# Altium PCB PCB_DBS_Module-v1.0.PcbDoc (part 4 of 4)
Units mil, origin at the board's own origin, x right, y up, seen from the top; angles counter-clockwise.
Board outline 5571 x 4173 mil, 4 copper layers (Top Layer, PWR + Signal, GND + Signal, Bottom Layer), stack 61.653 mil thick; 149 components, 108 nets, 494 pads, 359 vias.
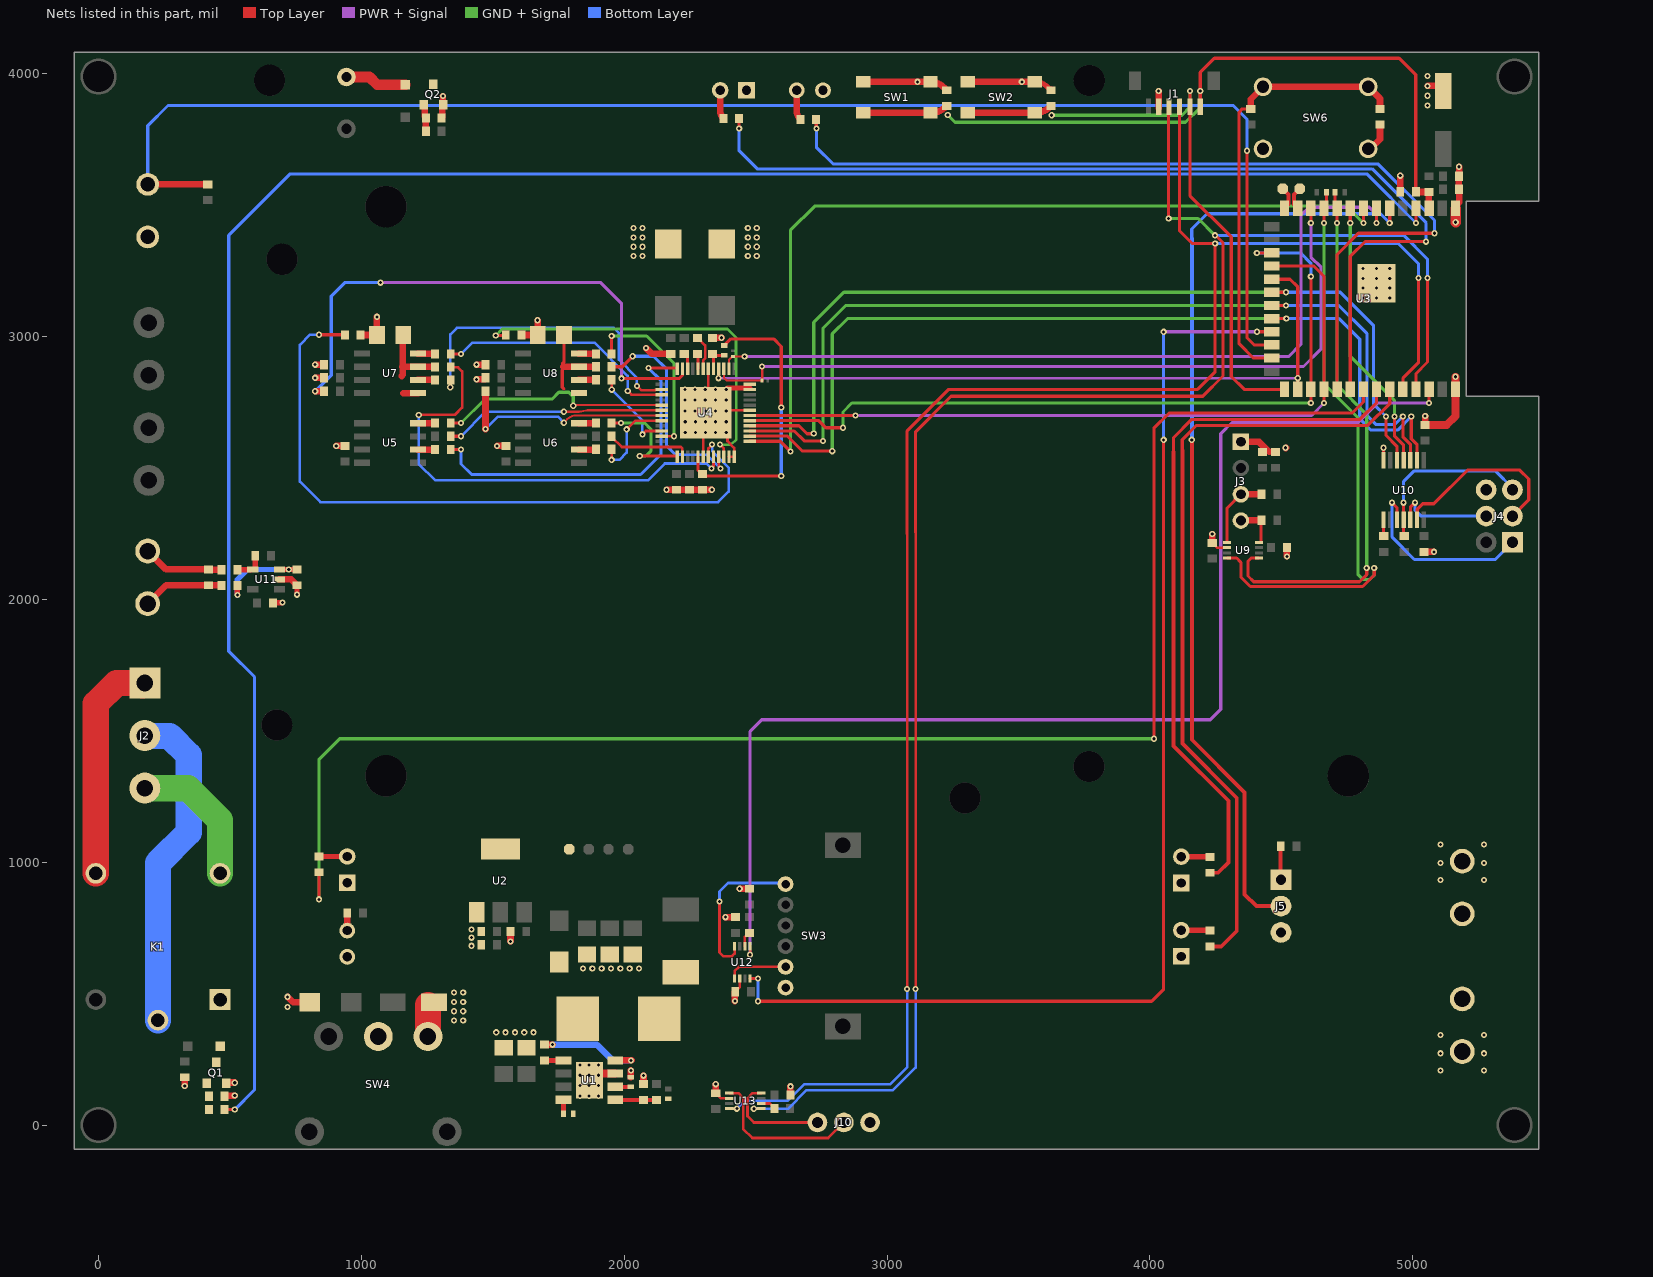
[diagram p4: the nets of this part, all layers, seen from the top]

## Via types
v1: diameter 23.62, hole 11.81, Top Layer to Bottom Layer, 359 vias

## Nets (pads, with @x,y where several pads share a name; then routed paths per layer and width w, separated by ;. In a path a pad name is that pad's centre, name@x,y a point inside that pad or via, vN(x,y) a via of type N, cw(c..) or ccw(c..) an arc to the next point about the centre after c; other vN are vias at no path point) (continued)
CA1: C26.1 U4.42 | length 841.7
  Top Layer w8: v1(1770,2714) 1828,2714 1855,2718.5 1861.13,2719.52 U4.42@2142.52,2719.52
  Top Layer w12: C26.1@1340,2620.5 v1(1379,2620.5)
  Bottom Layer w10: v1(1379,2620.5) 1472.5,2714 v1(1770,2714)
CA2: C29.1 U4.35 | length 2126.4
  Top Layer w12: v1(1989,2841) 2210.03,2841 2220.96,2851.93 2220.96,2876.7 U4.35@2221.26,2877
  Top Layer w25: v1(824,2792) C29.1@858,2792
  PWR + Signal w12: v1(1072,3205) 1911,3205 1989,3127 v1(1989,2841)
  Bottom Layer w12: v1(824,2792) 885,2853 885,3154 936,3205 v1(1072,3205)
CB1: C27.1 U4.2 | length 321.8
  Top Layer w10: C27.1@1952,2621 1952,2618.5 1990.5,2580 2215.26,2580 2221.12,2574.14 2221.12,2542.5 U4.2@2221.26,2542.35
CB2: C30.1 U4.43 | length 854
  Top Layer w8: v1@1769,2672 1782.92,2685.92 ; 1782.94,2685.94 cw(c1816.52,2652.32) 1816.52,2699.83 U4.43@2142.52,2699.83
  Top Layer w25: v1(1472,2648) C30.1@1472,2792
  Bottom Layer w10: v1(1472,2648) 1519,2695 1747,2695 v1(1770,2672)
CS_5V: J4.5 R30.1 U10.11 | length 670.7
  Top Layer w12: R30.1@4965,2242 U10.11@4965,2303.01 v1(4965,2368)
  Bottom Layer w12: v1(4965,2368) 4965,2449 5004,2488 5315,2488 5379,2424 J4.5@5379,2417
DC_VIN: D1.2 J11.1 SW4.1 | length 134.8
  Top Layer w50: D1.2@1228.98,456.54 1237.44,465 D1.2@1240.74,465
  Top Layer w100: SW4.1@1252.98,337 D1.2@1252.98,456.54
  other v1: 1352,397.5 1387,397.5 1352,433 1387,433 1352,468.5 1387,468.5 1352,504 1387,504 5105,932 5271,932 5105,997 5271,997 5105,1067 5271,1067
DRV-DIAG0: R11.2 U3.7 U4.26 | length 3126.1
  Top Layer w8: U4.26@2398.43,2877 2398.43,2911.57 2409.72,2922.86 2411.68,2922.86 R11.2@2413,2924.17 2457.83,2924.17 v1(2458,2924)
  Top Layer w12: v1(4862,3431.91) U3.7@4862,3487.98
  PWR + Signal w12: v1(2458,2924) 4528,2924 4574,2970 4574,3461 4605,3492 4834,3492 4862,3464 v1(4862,3431.91)
DRV-DIAG1: R12.2 U3.12 U4.27 | length 2950.5
  Top Layer w8: U4.27@2378.74,2877 2378.74,2843.75 2389.49,2833 R12.2@2524.17,2833
  Top Layer w10: R12.2@2524.17,2833 v1@2524.17,2886
  Top Layer w12: U3.12@4606,3493.98 U3.12@4612,3487.98 v1(4612,3431.91)
  PWR + Signal w12: v1(2524,2886) 4584,2886 4651,2953 4651,3262.98 4612,3301.98 v1(4612,3431.91)
DRV-DIR: U3.18 U3.30 U4.18 | length 2902.3
  Top Layer w12: U4.18@2477.17,2699.83 v1(2880,2699.83) ; U3.18@4462.93,3268.15 4518.85,3268.15 ; 4519,3268 4519.29,3268.29 4623.71,3268.29 4662,3230 U3.30@4662,2799 v1(4662,2747)
  PWR + Signal w12: v1(2880,2699.83) 4614.83,2699.83 v1(4662,2747)
DRV-EN: U3.19 U3.28 U4.28 | length 2742.5
  Top Layer w10: v1(2358.04,2841.6) 2358.84,2841.6 2359.06,2841.81 U4.28@2359.06,2877
  Top Layer w12: U3.19@4462.93,3218.15 4532.85,3218.15 4562,3189 U3.28@4562,2799
  PWR + Signal w10: v1(2358.04,2841.6) v1(4562,2841.6)
  Bottom Layer w10: v1(2358.04,2841.6) 2358.84,2841.6 v1@2359.06,2841.81
DRV-STEP: U3.17 U3.29 U4.17 | length 3036.2
  Top Layer w12: U4.17@2477.17,2680.15 2739.85,2680.15 2767,2653 v1(2832,2653) v1@2838,2653 ; v1@4406.72,3318.15 4462.64,3318.15 U3.17@4462.79,3318.29 U3.17@4462.93,3318.15 ; v1(4612,2747) U3.29@4612,2799 v1(4612,3228)
  GND + Signal w12: v1(2832,2653) 2832,2713 2866,2747 v1(4612,2747)
  Bottom Layer w12: v1(4406.57,3318.29) 4572.71,3318.29 4612,3279 v1(4612,3228)
ESP-EN: C15.2 C16.1 J1.6 R4.1 SW1.3 SW1.4 U3.3 | length 2941.5
  Top Layer w12: J1.6@4191.03,3869.59 J1.6@4191.03,3873.59 4191.03,3934 4191.06,4005.06 4245,4059 4948,4059 5011,3996 C15.2@5011,3555
  Top Layer w25: SW1.3@2909.05,3850.94 3110.94,3850.94 3111,3851 3111.06,3850.94 SW1.4@3164.95,3850.94 ccw(c3164.95,3937.84) 3226.4,3876.4 C16.1@3227,3877 ; C15.2@5011,3555 ccw(c5023.07,3567.07) 5023.07,3550 R4.1@5061,3550 5061,3490.39 ccw(c5064.41,3490.39) U3.3@5062,3487.98
  GND + Signal w12: v1(3230.71,3842.71) 3258.41,3815 4135,3815 4191.06,3871.06 v1(4191.06,3934)
GND: C2.1 C3.1 C5.1 C6.1 C7.1 C8.1 C9.1 C10.1 C11.1 C12.2 C13.1 C14.1 C15.1 C16.2 C17.2 C18.1 C19.2 C20.2 C22.2 C23.2 C24.2 C28.2 C31.2 C32.2 C33.2 C34.1 C35.1 C36.1 C37.2 C38.1 C39.1 C40.2 C41.2 C42.2 C43.2 C44.1 C45.2 C46.2 C47.2 C48.2 C49.2 C50.2 D2.1 D3.2 D4.1 J1.2 J3.1 J4.6 J5.3 J7.1 J9.2 J10.3 J11.2 LED1.2 LED2.1 LED3.1 LED4.1 LED5.1 LED6.2 P4.1 Q1.2 Q2.2 R2.1 R3.1 R20.1 R21.1 R22.2 R23.2 R25.1 R27.1 R32.2 SW1.1 SW1.2 SW2.1 SW2.2 SW3.1 SW6.3 SW6.4 U1.7 U1.9 U2.1 U2.4 U3.1 U3.40 U3.41 U4.6 U4.11 U4.12 U4.19 U4.23 U4.24 U4.30 U4.49 U9.2 U10.7 U11.2 U12.2 U13.2 | length 4000.5
  Top Layer w10: U4.6@2300,2542.35 2300,2620 U4.49@2309,2629 ; U4.49@2308,2793 2309.58,2793 2319.68,2803.1 U4.30@2319.68,2877 ; C49.2@2348,121 2350.5,121 2360.5,111 2360.5,109.57 2368.23,101.84 U13.2@2398.98,101.84 ; U4.49@2388,2629 2392.89,2624.11 2392.89,2602.11 2418.11,2576.89 U4.12@2418.11,2542.35 U4.11@2398.43,2542.35 ; U4.49@2388,2711 2396.52,2719.52 U4.19@2477.17,2719.52 ; U4.49@2388,2793 U4.49@2393.26,2798.26 ; C46.2@2422,792 C46.2@2423,791 ; C47.2@2423,509.5 2439.31,525.81 U12.2@2439.31,557.95 ; U4.23@2477.17,2798.26 2477.17,2804.26 U4.24@2477.17,2817.94 ; C41.2@4249.5,2202.7 4255.36,2196.84 U9.2@4292.98,2196.84
  Top Layer w12: v1(4888,2577) 4888.11,2576.89 4888.11,2529.11 U10.7@4888.23,2528.99
  Top Layer w20: C44.1@663,1986 664.31,1987.31 699.31,1987.31 v1(700,1988) ; v1(755,2018) R32.2@755,2054 ; U4.49@2393.26,2804.26 U4.23@2477.17,2804.26 ; SW2.1@3561.95,3969.06 cw(c3561.95,3899.06) 3611.45,3948.55 C17.2@3623,3937
  Top Layer w25: v1(328,149) C37.2@328,182 ; R25.1@481.87,112.37 v1(518,112.37) ; Q1.2@485.4,159.63 487.77,162 v1@518,162 ; U11.2@688.18,2076 733,2076 750,2059 750,2056.5 752.5,2054 R32.2@755,2054 ; v1(719,488) 740,467 D2.1@803.26,467 ; v1(824,2843) C32.2@858,2843 ; v1(824,2893) C33.2@858,2893 ; v1(904,2584) C23.2@938,2584 ; R22.2@997,3006 R20.1@1059,3006 v1(1059,3075) ; R27.1@1305,3831 1307.5,3833.5 1307.5,3875.76 Q2.2@1311.4,3879.66 ; v1(1310,3915) 1310,3881.06 Q2.2@1311.4,3879.66 ; Q2.2@1311.4,3881.63 Q2.2@1311.4,3879.66 ; v1(1438,2893) C31.2@1472,2893 ; v1@1438.81,2837 C28.2@1469.5,2837 ; v1(1516,2584) C24.2@1550,2584 ; U2.4@1529,1050.16 U2.4@1529.16,1050 ; v1(1567,699) C9.1@1567,737 ; R23.2@1609,3006 R21.1@1671,3006 1670,3007 v1(1670,3062) ; U1.9@1867,171 U1.9@1892,196 ; C8.1@2025,182.5 v1(2025,208) ; R2.1@2073,156 v1(2073,188) ; v1(2083,2956) 2105,2934 C22.2@2177,2934 ; v1@2165,2417 C18.1@2199,2417 C34.1@2248,2417 C35.1@2297,2417 v1(2333,2417) ; C36.1@2336,2994 2337.42,2995.42 v1(2369.92,2995.42) ; C49.2@2348,121 v1(2348,155.62) ; v1(2385,791) C46.2@2422,791 ; v1(2421,472) 2421,506 C47.2@2422,507 ; v1(2439,899) C45.2@2476,899 ; C48.2@2632,114 v1(2632,147.5) ; SW1.2@2909.05,3969.06 v1(3115.45,3969.06) SW1.1@3164.95,3969.06 cw(c3164.95,3896.65) 3216.15,3947.85 C16.2@3227,3937 ; SW2.2@3306.05,3969.06 v1(3512.45,3969.06) SW2.1@3561.95,3969.06 ; C17.2@3623,3937 C17.2@3624,3938 ; J1.2@4033.55,3869.59 J1.2@4033.55,3873.59 v1@4033.55,3934 ; C41.2@4237,2215 v1(4237,2248.5) ; J3.1@4347,2599 4415,2599 4453,2561 ; v1@4516,2575.07 v1@4518.5,2577.57 ; v1(4521,2163.5) C40.2@4521,2197 ; SW6.4@4830,3712.89 4837.57,3712.89 4875,3750.32 C50.2@4875,3804 ; C15.1@4952,3551 v1(4952,3612) ; C42.2@5043,2180 C42.2@5042,2181 v1(5080,2181) ; C43.2@5046,2664 5047,2664 v1(5047,2697.5) ; v1(5056.19,3953.5) 5096.97,3953.5 C12.2@5116,3934.47 ; U3.1@5166.5,3500.79 5176,3510.29 C13.1@5176,3560 ; C13.1@5172.5,3557.5 C13.1@5175,3560 C14.1@5175,3610 ; C14.1@5176,3610 v1(5176,3646.1)
  Top Layer w30: U1.9@1892,196 U1.7@1965.33,196 ; C43.2@5047,2664 5129,2664 5162,2697 U3.40@5162,2799 v1(5162,2847)
  Top Layer w40: v1(5163,3435) U3.1@5163,3486.98
  other v1: 1831,111 1866.5,111 1902,111 1831,150.33 1866.5,150.33 1902,150.33 518,161 1831,189.67 1866.5,189.67 1902,189.67 1831,229 1866.5,229 1902,229 1513,353 1548.5,353 1584,353 1619.5,353 1655,353 719,449 1843,596 1878.5,596 1914,596 1949.5,596 1985,596 2020.5,596 2056,596 1419,682 1419,713 1419,744 2161,2417 4516,2577 2232,2635 2270.5,2635 2309,2635 2347.5,2635 2388,2635 2232,2676 2270.5,2676 2309,2676 2347.5,2676 2388,2676 2231,2717 2269.5,2717 2308,2717 2346.5,2717 2388,2717 2231,2758 2269.5,2758 2308,2758 2346.5,2758 2388,2758 2231,2799 2269.5,2799 2308,2799 2346.5,2799 2388,2799 1438,2837.19 4810,3146.5 4862,3146.5 4912,3146.5 4810,3184 4862,3184 4912,3184 4810,3221.5 4862,3221.5 4912,3221.5 4810,3259 4862,3259 4912,3259 2035,3306.04 2069,3306.04 2470,3306.04 2504,3306.04 2035,3341.54 2069,3341.54 2470,3341.54 2504,3341.54 2035,3377.04 2069,3377.04 2470,3377.04 2504,3377.04 2035,3412.54 2069,3412.54 2470,3412.54 2504,3412.54 5056.19,3878.5 5056.19,3916 4033.1,3934 5056.19,3991
HA1: R7.1 U4.41 | length 895
  Top Layer w8: v1(1806,2736.65) cw(c1812.18,2730.47) 1812.18,2739.2 U4.41@2142.52,2739.2
  Top Layer w12: R7.1@1340,2671 v1(1379,2671)
  GND + Signal w12: v1(1379,2671) 1470,2762 1725,2762 1751,2788 1789.3,2788 1806,2771.3 v1(1806,2736.65)
  Bottom Layer w8: v1@1804.73,2735.38 v1(1806,2736.65)
HA2: R8.2 U4.36 | length 1363.2
  Top Layer w12: R8.2@1340,2570 v1(1379,2570) ; v1(2092,2880) 2201.28,2880 2201.57,2879.7 U4.36@2201.57,2877
  Bottom Layer w12: v1(1379,2570) 1379,2515 1419,2475 2062,2475 2140,2553 2140,2832 v1(2092,2880)
HB1: R9.1 U4.1 | length 438.8
  Top Layer w12: R9.1@1952,2671 v1(1987,2671) ; v1(2059,2546) 2201.28,2546 2201.57,2545.7 U4.1@2201.57,2542.35
  GND + Signal w12: v1(1987,2671) 2077.96,2671 2101,2647.96 2101,2564 2083,2546 v1(2059,2546)
  Bottom Layer w12: v1@2059,2545.22 v1(2059,2546)
HB2: R10.2 U4.44 | length 344.4
  Top Layer w10: v1(1952,2531) R10.2@1952,2571 ; v1(2009,2647) 2042.15,2680.15 U4.44@2142.52,2680.15
  Bottom Layer w10: v1(1952,2531) 1982,2531 2009,2558 v1(2009,2647)
HOME_SW: J9.1 R41.1 U3.24 | length 5623.4
  Top Layer w12: R41.1@413,3579 R41.1@415,3579 ; v1(4369,3707) 4369,2995 4395.64,2968.36 U3.24@4462.86,2968.36 ; U3.24@4462.93,2968.15 U3.24@4463.01,2968.22
  Top Layer w25: J9.1@187,3579 R41.1@413,3579
  Bottom Layer w12: J9.1@187,3579 187,3802 264,3879 4317,3879 4369,3827 v1(4369,3707)
I2C_SCL: R6.1 U3.10 U9.5 | length 2074.6
  Top Layer w12: U9.5@4415.02,2157.47 4385.47,2157.47 4373,2145 4373,2089 4395,2067 4797,2067 4824.38,2094.38 v1(4824.38,2119.6) ; R6.1@4704,3544.05 4704,3495.98 U3.10@4712,3487.98 v1(4712,3431.91)
  GND + Signal w12: v1(4712,3431.91) 4712,2815.57 4824.38,2703.18 v1(4824.38,2119.6)
I2C_SDA: R5.1 U3.11 U9.4 | length 2292.3
  Top Layer w12: U9.4@4292.98,2157.47 4329.53,2157.47 4346,2141 4346,2085 4382,2049 4809,2049 4853,2093 v1(4853,2119) ; v1(4662,3431.91) U3.11@4662,3487.98 4671,3496.98 R5.1@4671,3542.13
  GND + Signal w12: v1(4662,3431.91) 4662,2820 4792,2690 4792,2094 4810,2076 4837,2076 4853,2092 v1(4853,2119)
  Bottom Layer w12: v1(4853,2119) v1@4854.82,2120.82
IO0: C17.1 J1.5 SW2.3 SW2.4 U3.27 | length 2298.8
  Top Layer w12: v1(4151.69,3934) J1.5@4151.66,3873.59 4151.66,3536.34 4309,3379 4309,2848 4358,2799 U3.27@4512,2799
  Top Layer w25: SW2.3@3306.05,3850.94 SW2.4@3561.95,3850.94 ccw(c3561.95,3935.42) 3621.69,3875.69 C17.1@3623,3877
  GND + Signal w12: v1(3626,3842) 4122,3842 4151.69,3871.69 v1(4151.69,3934)
KILL_RELAY: R24.1 U3.4 | length 8183.4
  Top Layer w12: R24.1@479.5,59 v1(518,59) ; v1@5012,3432.06 U3.4@5012,3487.98
  Bottom Layer w12: v1(518,59) 593,134 593,1705 495,1803 495,3385 729,3619 4824.76,3619 v1(5011.85,3431.91)
LA1: R13.1 U4.39 | length 935.8
  Top Layer w10: v1(2013,2793) 2027.43,2778.57 U4.39@2142.52,2778.57
  Top Layer w12: R13.1@1340,2934 v1(1379,2934)
  Bottom Layer w10: v1(1379,2934) 1422,2977 1885.85,2977 2013,2849.85 v1(2013,2793)
LA2: R14.2 U4.38 | length 1221.1
  Top Layer w10: v1(2048,2812) 2063.87,2796.13 2117.65,2796.13 2118.47,2796.96 2141.22,2796.96 U4.38@2142.52,2798.26
  Top Layer w12: v1(1338,2807.26) 1339,2808.26 1339,2834 R14.2@1340,2835
  Bottom Layer w10: v1(1338,2807.26) 1338,3008 1363,3033 1960,3033 1979,3014 1979,2912 2048,2843 v1(2048,2812)
LB1: R15.1 U4.47 | length 671.9
  Top Layer w10: U4.47@2142.62,2621 v1@2189.17,2621
  Top Layer w12: R15.1@1952,2934 v1(1952,3002)
  GND + Signal w12: v1(1952,3002) 2085,3002 2189.17,2897.83 v1(2189.17,2620.78)
LB2: R16.2 U4.46 | length 335
  Top Layer w10: v1(1952.17,2797.84) R16.2@1952.17,2835.83 ; v1(2069,2628) 2081.78,2640.78 U4.46@2142.52,2640.78
  Bottom Layer w10: v1(1952.17,2797.84) 2069,2681.01 v1(2069,2628)
MISO_5V: J4.1 U10.10 | length 723.7
  Top Layer w12: v1(4921,2368) 4939.41,2349.59 U10.10@4939.41,2303.01
  Bottom Layer w12: v1(4921,2368) 4921,2237 5006,2152 5314,2152 J4.1@5379,2217
MODE: J5.2 U3.6 | length 3618.6
  Top Layer w12: v1@4912,3432.06 U3.6@4912,3487.98
  Top Layer w15: v1(4159,2607) 4159,1467 4360,1266 4360,878 4405,833 J5.2@4498.4,833
  Bottom Layer w12: 4159,3374 4159,3409 4217,3467 4876.76,3467 v1(4911.85,3431.91)
  Bottom Layer w15: v1(4159,2607) 4159,3374
MOSI_5V: J4.4 U10.12 | length 380.1
  Top Layer w12: U10.12@4990.59,2303.01 4990.59,2350.72 v1(5007.87,2368)
  Bottom Layer w12: v1(5007.87,2368) 5007.87,2341.13 5032,2317 J4.4@5279,2317
NetC1_1: C1.1 D3.1 L1.1 U1.8 | length 416.5
  Top Layer w25: C1.1@1697,306 v1(1727,306) ; U1.8@1965.33,246 v1(2025,246) v1@2029,246
  Bottom Layer w25: v1(1727,306) 1896,306 1956,246 v1(2025,246)
NetC1_2: C1.2 U1.1 | length 71.7
  Top Layer w20: C1.2@1697,246 U1.1@1768.67,246
NetC4_1: C4.1 R1.1 R2.2 U1.5 | length 160.2
  Top Layer w12: R1.1@2123,96 R1.1@2125.5,96
  Top Layer w15: U1.5@1965.33,96 R2.2@2073,96 R1.1@2123,96
NetC8_2: C8.2 U1.6 | length 59.9
  Top Layer w12: U1.6@1965.33,146 U1.6@1965.58,145.75 ; C8.2@2024.75,145.75 C8.2@2025,145.5
  Top Layer w15: U1.6@1965.58,145.75 C8.2@2024.75,145.75
NetC21_2: C21.2 U4.34 | length 62.5
  Top Layer w12: C21.2@2230,2935 2230,2934.5 2240.94,2923.56 U4.34@2240.94,2877
NetC25_1: C25.1 U4.31 | length 134.2
  Top Layer w10: C25.1@2278,2994 2280.5,2994 2308,2966.5 2308,2917.21 2300,2909.21 U4.31@2300,2877
NetC25_2: C25.2 U4.32 | length 57.5
  Top Layer w12: C25.2@2279,2934 2280.02,2932.98 2280.02,2877.3 U4.32@2280.31,2877
NetC35_2: C35.2 R19.1 U4.5 | length 1111.7
  Top Layer w12: U4.5@2280.32,2542.35 2280.32,2491.19 2294.5,2477 C35.2@2297,2477 2305,2469 v1(2597,2469) ; R19.1@2380,2965.5 2383.5,2965.5 2386.5,2968.5 2386.5,2972 2405.5,2991 2568,2991 2597,2962 v1(2597,2730.04)
  Bottom Layer w12: v1(2597,2469) v1(2597,2730.04)
NetC36_2: C36.2 R19.2 U4.29 | length 104.7
  Top Layer w12: U4.29@2339.37,2877 2339.07,2877.3 2339.07,2930.93 2338.75,2931.25 C36.2@2336,2934 2341.5,2928.5 R19.2@2380,2928.5
NetD5_1: D5.1 K1.1 Q1.3
NetD6_1: D6.1 LS1.2 Q2.3 | length 236.2
  Top Layer w40: LS1.2@943,3987.42 1030.58,3987.42 1059.99,3958.01 D6.1@1167,3958.01
NetJ2_1: J2.1 K1.3 | length 876.7
  Top Layer w100: K1.3@-10.44,958 -10.44,1602.56 69,1682 J2.1@176,1682 J2.1@166.94,1672.94
NetJ2_3: J2.3 K1.2 | length 538.5
  GND + Signal w100: J2.3@176,1282 340,1282 462,1160 K1.2@462,958
NetJ5_1: J5.1 R40.1 | length 128.2
  Top Layer w12: J5.1@4497.28,934.11 J5.1@4498.4,933
  Top Layer w15: J5.1@4497.28,934.11 R40.1@4497.28,1060.73
NetJ6_1: J6.1 R33.1 R34.2 | length 310.4
  Top Layer w25: J6.1@187,1984 257,2054 R34.2@418,2054 418.5,2053.5 467.5,2053.5 R33.1@468,2053
NetJ6_2: J6.2 R34.1 R35.1 | length 310.4
  Top Layer w25: J6.2@187,2184 257,2114 R34.1@418,2114 418.5,2113.5 467.5,2113.5 R35.1@468,2113
NetLED1_1: LED1.1 R38.2 | length 114.7
  Top Layer w25: LED1.1@2656,3937 2656,3859.8 ccw(c2703.8,3859.8) R38.2@2670,3826
NetLED2_2: LED2.2 R39.2 | length 110.2
  Top Layer w25: LED2.2@2365,3937 2365,3858.97 ccw(c2405.97,3858.97) R39.2@2377,3830
NetLED3_2: LED3.2 R42.2 | length 107
  Top Layer w20: R42.2@839,1022 LED3.2@946,1022
NetLED4_2: LED4.2 R43.2 | length 106.4
  Top Layer w15: LED4.2@4119,1021 LED4.2@4119.5,1020.5 ; R43.2@4224.5,1020.5 R43.2@4225,1020
  Top Layer w20: LED4.2@4119.5,1020.5 R43.2@4224.5,1020.5
NetLED5_2: LED5.2 R44.2 | length 105.1
  Top Layer w15: R44.2@4224.44,741.56 R44.2@4227,739
  Top Layer w20: LED5.2@4123,741.56 R44.2@4224.44,741.56
NetLED6_1: LED6.1 R45.2 | length 67.4
  Top Layer w25: LED6.1@946,740 946.5,740.5 946.5,806.5 R45.2@947,807
NetQ1_1: Q1.1 R24.2 R25.2
NetQ2_1: Q2.1 R26.2 R27.2 | length 104.1
  Top Layer w25: Q2.1@1236.6,3881.63 1240.24,3877.99 1240.24,3838.26 1245,3833.5 R27.2@1245,3831 R26.2@1245,3781
NetR3_2: R3.2 U1.4 | length 53.1
  Top Layer w20: R3.2@1768.5,43 1768.59,43.09 1768.59,95.91 U1.4@1768.67,96
NetR7_2: R7.2 U5.4 | length 61.7
  Top Layer w25: U5.4@1215.3,2670 R7.2@1277,2670
NetR8_1: R8.1 U5.2 | length 62.7
  Top Layer w25: U5.2@1215.3,2570 R8.1@1278,2570
NetR9_2: R9.2 U6.4 | length 61.7
  Top Layer w25: U6.4@1827.3,2670 R9.2@1889,2670
NetR10_1: R10.1 U6.2 | length 62.7
  Top Layer w25: U6.2@1827.3,2570 R10.1@1890,2570
NetR13_2: R13.2 U7.4 | length 61.7
  Top Layer w25: U7.4@1215.3,2935 R13.2@1277,2935
NetR14_1: R14.1 U7.2 | length 62.7
  Top Layer w25: U7.2@1215.3,2835 R14.1@1278,2835
NetR15_2: R15.2 U8.4 | length 61.7
  Top Layer w25: U8.4@1827.3,2935 R15.2@1889,2935
NetR16_1: R16.1 U8.2 | length 62.7
  Top Layer w25: U8.2@1827.3,2835 R16.1@1890,2835
NetR17_2: R17.2 R20.2 U7.1 U7.3 | length 335.8
  Top Layer w25: 1153,2850 1157.25,2854.25 1157.25,2885 ; 1156,2885 1157.25,2885 ; R20.2@1159,3006 1157.25,3004.25 1157.25,2885 ; 1160,2785 U7.1@1215.3,2785 ; R17.2@1278,2885 U7.3@1215.3,2885 1157.25,2885
NetR18_2: R18.2 R21.2 U8.1 U8.3 | length 332.4
  Top Layer w12: 1770,2801 1764,2807 1764,2873 1766,2875 1766,2899 1771,2904 R21.2@1771,3006
  Top Layer w25: 1768,2885 U8.3@1827.3,2885 R18.2@1890,2885
NetR31_2: R31.2 U10.8 | length 65.3
  Top Layer w12: U10.8@4888.23,2303.01 4888.61,2302.62 4888.61,2238.39 R31.2@4889,2238
NetR32_1: R32.1 R33.2 U11.3 | length 373.2
  Top Layer w20: v1(528,2017) R33.2@528,2053 ; U11.3@688.18,2113.4 688.48,2113.7 723.09,2113.7 v1(723.39,2114) R32.1@755,2114
  Bottom Layer w20: v1(528,2017) 528,2076 566,2114 v1(723.39,2114)
NetR35_2: R35.2 R36.1 U11.4 | length 109.7
  Top Layer w20: R35.2@528,2113 U11.4@576.67,2113 ; U11.4@585.82,2113.4 593.85,2113.4 595.66,2115.21 R36.1@595.66,2165.66
NetR37_1: R37.1 U12.6 | length 59.5
  Top Layer w10: U12.6@2459,680 2459,716.5 2473.5,731 R37.1@2476,731
NetR47_1: R47.1 U13.6 | length 59.4
  Top Layer w10: U13.6@2521.02,82.16 2554.34,82.16 2571,65.5 R47.1@2571,63
O2_HEATING: R42.1 U3.33 | length 5911.7
  Top Layer w12: v1(839,859) R42.1@839,962 ; v1(4015,1470) 4015,2651 4073,2709 4770,2709 4812,2751 U3.33@4812,2799
  GND + Signal w12: v1(839,859) 839,1392 917,1470 v1(4015,1470)
OUT_A: U3.38 U12.5 | length 4648.4
  Top Layer w10: v1(2478.68,648) U12.5@2478.68,680
  Top Layer w12: v1(5062,2747) U3.38@5062,2799
  PWR + Signal w12: v1(2478.68,648) 2478.68,1497.68 2523,1542 4229,1542 4269,1582 4269,2630 4312,2673 4793,2673 4867,2747 v1(5062,2747)
OUT_A_5V: SW3.6 U12.8 | length 592.5
  Top Layer w10: v1(2362,851) 2362,657 2376,643 2410,643 2419.63,652.63 U12.8@2419.63,680
  Bottom Layer w10: v1(2362,851) 2362,888 2394.81,920.81 2609.54,920.81 SW3.6@2613.5,916.85
OUT_B: U3.23 U12.4 | length 4592.8
  Top Layer w12: U12.4@2478.68,557.95 v1(2508.5,557.95) ; v1(2509,471) 4006,471 4052,517 v1(4052,2607) ; v1(4406.94,3018.36) U3.23@4462.86,3018.36
  PWR + Signal w12: v1@4049,3018 4049.18,3018.18 4406.76,3018.18 v1(4406.94,3018.36)
  Bottom Layer w12: v1@2508.5,471 v1(2508.5,557.95) ; v1(4052,2607) v1@4052,3017
  other v1: 4052,3018
OUT_B_5V: SW3.2 U12.1 | length 228.3
  Top Layer w10: U12.1@2419.63,557.95 2419.63,585.63 2435.89,601.89 SW3.2@2613.5,601.89
RLY_COM: J2.2 K1.5 | length 1241.7
  Bottom Layer w100: J2.2@176,1482 177.82,1480.18 269.82,1480.18 343,1407 ; K1.5@225.78,398.95 225.78,996.78 343,1114 343,1394
RUN_LED: R43.1 U3.34 | length 2666.4
  Top Layer w12: 4090,2560 4090,2616 4159,2685 4798,2685 4862,2749 U3.34@4862,2799
  Top Layer w15: 4090,2560 4090,1442 4298,1234 4298,999 4259,960 R43.1@4228,960
RXD0: J1.4 U3.36 U13.4 | length 6850.9
  Top Layer w10: U13.4@2398.98,62.47 v1@2428,62.53 ; v1(3076,518) 3076,1348 3076,1453 3076,2250
  Top Layer w12: 3076,2250 3076,2641 3234,2799 4181,2799 4248,2866 v1(4248,3354) 4161,3354 4112.29,3402.71 J1.4@4112.29,3873.59 ; U3.36@4962,2799 4962,2841 5021,2900 v1@5021,3222
  Bottom Layer w10: v1(2428.19,62.53) 2457.66,92 2621,92 2684,155 3011,155 3076,220 3076,431 v1(3076,518)
  Bottom Layer w12: v1(4248,3354) 4945,3354 5021,3278 v1@5021,3222
  other v1: 5021,3222.46
RXD_5V: J10.2 U13.1 | length 600.3
  Top Layer w10: U13.1@2398.98,121.53 2434.47,121.53 2452,104 2452,-14 2487.05,-49.06 2775.95,-49.06 J10.2@2835,10
SCK_5V: J4.3 U10.13 | length 706.8
  Top Layer w12: U10.13@5016.18,2303.01 5016.81,2303.64 5016.81,2342.81 5038,2364 5080,2364 5208,2492 5407,2492 5441,2458 5441,2379 J4.3@5379,2317
SCL_5V: J3.4 R29.1 U9.8 | length 158.6
  Top Layer w12: U9.8@4423,2217.43 R29.1@4423,2300
  Top Layer w25: J3.4@4346.5,2300.5 R29.1@4422.5,2300.5
SDA_5V: J3.3 R28.1 U9.1 | length 282.4
  Top Layer w12: U9.1@4292.98,2216.53 4292.98,2346.98 J3.3@4346,2400
  Top Layer w25: J3.3@4346.5,2399.5 R28.1@4423.5,2399.5
SPI_CS0: U3.8 U4.13 | length 3312.5
  Top Layer w12: U4.13@2477.17,2601.41 2593.59,2601.41 v1(2632,2563) ; v1(4812,3431.91) U3.8@4812,3487.98
  GND + Signal w12: v1(2632,2563) 2632,3404 2724,3496 4747.91,3496 v1(4812,3431.91)
SPI_CS1: U3.9 U10.4 | length 1043.1
  Top Layer w12: v1@4762,3432.06 U3.9@4762,3487.98 ; v1(4929.87,2696.13) 4930,2696 4930,2622 4965,2587 U10.4@4965,2528.99
  GND + Signal w12: v1(4761.85,3431.91) 4761.85,2925.15 4930,2757 4930,2696.26 v1(4929.87,2696.13)
SPI_MISO: U3.20 U4.16 U10.5 | length 3513.7
  Top Layer w12: U4.16@2477.17,2660.46 2664.54,2660.46 2695,2630 2720,2630 v1(2721,2631) ; U3.20@4462.79,3168.29 U3.20@4462.79,3168.29 4517.82,3168.33 v1(4517.85,3168.36) ; v1(4898,2696) 4898,2624 4939.41,2582.59 U10.5@4939.41,2528.99
  GND + Signal w12: v1(2721,2631) 2721,3054 2835.36,3168.36 v1(4517.85,3168.36)
  Bottom Layer w12: v1(4517.85,3168.36) 4723.64,3168.36 4851,3041 4851,2743 v1(4898,2696)
SPI_MOSI: U3.21 U4.15 U10.3 | length 3583.8
  Top Layer w12: U4.15@2477.17,2640.78 2646.22,2640.78 2684,2603 v1@2758,2603 ; U3.21@4462.93,3118.15 4463.01,3118.22 v1(4517.85,3118.22) v1@4518,3118.22 ; v1(4961.87,2696.13) 4962,2696 4962,2619 4990.59,2590.41 U10.3@4990.59,2528.99
  GND + Signal w12: v1(2756,2603) 2756,3032 2842.22,3118.22 v1(4517.85,3118.22)
  Bottom Layer w12: v1@4518,3118.22 4718.78,3118.22 4825,3012 4825,2700 4859,2666 4932,2666 4961.87,2695.87 v1(4961.87,2696.13)
SPI_SCLK: U3.22 U4.14 U10.2 | length 3673.4
  Top Layer w12: U4.14@2477.17,2621.09 2620.91,2621.09 2678,2564 v1(2791,2564) ; U3.22@4462.71,3068.22 v1@4518.64,3068.22 ; U3.22@4462.79,3068.29 v1(4518.71,3068.29) ; v1(4994,2696) 4994,2611.04 5016.18,2588.86 U10.2@5016.18,2528.99
  GND + Signal w12: v1(2791,2564) 2791,3010 2849.29,3068.29 v1(4518.71,3068.29)
  Bottom Layer w12: v1(4518.71,3068.29) 4719.71,3068.29 4798,2990 4798,2687 4841,2644 4942,2644 v1(4994,2696)
SRAH: R17.1 U4.8 | length 1771.7
  Top Layer w10: v1(1218,2702) 1355,2702 1383,2730 1383,2867 1367.14,2882.86 1341.64,2882.86 R17.1@1340,2884.5 ; v1(2332,2498) 2339.37,2505.37 U4.8@2339.37,2542.35
  Bottom Layer w10: v1(1218,2702) 1218,2516 1281,2453 2090,2453 2154,2517 2313,2517 v1(2332,2498)
SRAL: R22.1 U4.7 | length 2645.1
  Top Layer w10: R22.1@936,3007 R22.1@937,3006 ; U4.7@2319.68,2542.35 2319.78,2542.45 2319.78,2574.78 v1(2334,2589)
  Top Layer w12: v1(838,3007) R22.1@936,3007
  Bottom Layer w10: v1(838,3007) 805,3007 766,2968 766,2448 844,2370 2357,2370 2397,2410 2397,2501 2334,2564 v1(2334,2589)
SRBH: R18.1 U4.9 | length 825.1
  Top Layer w10: U4.9@2359.06,2542.35 2359.06,2505.37 v1(2366.43,2498)
  Top Layer w12: R18.1@1952,2885 1992,2885 v1(2032,2925)
  Bottom Layer w10: 2214,2551 2313.43,2551 v1(2366.43,2498)
  Bottom Layer w12: v1(2032,2925) 2111,2925 2161,2875 2161,2585 2195,2551 2214,2551
SRBL: R23.1 U4.10 | length 1486.9
  Top Layer w10: v1(1511,3004) 1547,3004 R23.1@1549,3006 ; v1(2364.52,2588.9) 2378.74,2574.69 U4.10@2378.74,2542.35
  GND + Signal w10: v1(1511,3004) 1535.72,3028.72 2392.28,3028.72 2425,2996 2425,2876 2426,2875 2426,2608 2406.9,2588.9 v1(2364.52,2588.9)
STATUS_GRN: R39.1 U3.32 | length 3739.2
  Top Layer w12: v1(2437,3792) R39.1@2437,3830 ; U3.32@4762,2799 4762,3305 4818,3361 v1(5050.38,3361)
  Bottom Layer w12: v1(2437,3792) 2437,3707 2506,3638 4845,3638 5050.38,3432.62 v1(5050.38,3361)
STATUS_RED: R38.1 U3.31 | length 3538.4
  Top Layer w12: R38.1@2730,3826 2730.5,3825.5 2730.5,3792.5 v1(2731,3792) ; U3.31@4712,2799 4712,3312 4793,3393 v1(5082.19,3393)
  Bottom Layer w12: v1(2731,3792) 2731,3720 2794,3657 4867,3657 5082.19,3441.81 v1(5082.19,3393)
TEST_LED: R44.1 U3.35 | length 2980.9
  Top Layer w12: 4123,2566 4123,2608 4177,2662 4829,2662 4912,2745 U3.35@4912,2799
  Top Layer w15: 4123,2566 4123,1452 4330,1245 4330,739 4271,680 R44.1@4228,680
TOGGLE: C50.1 R46.2 SW6.1 SW6.2 U3.25 | length 1682.1
  Top Layer w12: R46.2@4383,3866 4351,3866 4339,3854 4339,2972 4392.56,2918.44 U3.25@4462.64,2918.44
  Top Layer w25: R46.2@4383,3866 4383,3903.11 SW6.1@4430,3950.11 SW6.2@4830,3950.11 4875,3905.11 C50.1@4875,3867
TXD0: J1.3 U3.37 U13.5 | length 6916.2
  Top Layer w10: v1(2492.81,62.16) 2492.81,62.47 U13.5@2521.02,62.47 ; v1(3108.33,518) 3108.33,1351 3108.33,1453 3108.33,2254
  Top Layer w12: 3108.33,2254 3108.33,2638.33 3243,2773 4201,2773 4278,2850 4278,3356.26 v1@4249.26,3385 ; v1(4071,3449) 4071,3867.67 J1.3@4072.92,3869.59 ; U3.37@5012,2799 5012,2859 5056,2903 v1(5056,3222.46)
  GND + Signal w12: v1(4071,3449) 4183,3449 v1(4247,3385)
  Bottom Layer w10: v1(2492.81,62.16) 2622.16,62.16 2693,133 3022,133 3108.33,219.33 v1(3108.33,518)
  Bottom Layer w12: v1(4247,3385) 4965,3385 5056,3294 v1(5056,3222.46)
TXD_5V: J10.1 U13.8 | length 404.1
  Top Layer w10: U13.8@2521.02,121.53 2488.53,121.53 2469,102 2469,34 2493,10 J10.1@2735,10
USB_D_N: TP2.1 U3.13 | length 101.4
  Top Layer w15.73: U3.13@4562,3487.98 4547.86,3502.11 4547.86,3539.86 TP2.1@4570,3562
  Top Layer w16.03: U3.13@4562,3487.98 U3.13@4562,3499.79 ; TP2.1@4567.49,3562 TP2.1@4568,3562
USB_D_P: TP1.1 U3.14 | length 90.4
  Top Layer w15.73: TP1.1@4505,3562 4527.14,3539.86 4527.14,3503.11 U3.14@4512,3487.98
  Top Layer w16.03: TP1.1@4502,3562 TP1.1@4502.91,3562
VDC: J7.2 SW4.2
  other v1: 5105,208 5271,208 5105,273 5271,273 5105,343 5271,343
pads on no net: J1.MP1 J1.MP2 J4.2 SW3.3 SW3.4 SW3.7 SW4.3 SW4.MH1 SW4.MH2 U3.15 U3.16 U3.26 U4.25 U10.6 U10.9

## Polygon pours and split planes (outlines as drawn)
GND on Bottom Layer "GND_L04_P026" (solid, remove dead copper, pour order 26): -73,4060 5462,4060 5462,3533 5181,3533 5181,2756 5462,2756 5462,-80 -73,-80
VDC on Bottom Layer "NONET_L-01_P-001" (solid, remove dead copper, pour order 0): 1418,146 1491,73 5079,73 5079,360 5462,360 5462,-80 981,-80 981,401 1157.09,401 1156.92,257 1418,257
DC_VIN on Bottom Layer "NONET_L-01_P-001" (solid, remove dead copper, pour order 6): 1165,1116 1165,269 1419,269 1419,868 5292,868 5292,1116
12V on Top Layer "12V_L01_P012" (solid, remove dead copper, pour order 12): 581,1243 581,579.61 553.39,552 -72,552 -72,-74 1171,-74 1171,1131 1226,1186 1929,1186 1985,1130 1985,965 2058,965 2057,966 2057,1155 1969,1243
GND on Top Layer "GND_L01_P027" (solid, remove dead copper, pour order 27): -73,4060 5462,4060 5462,3533 5181,3533 5181,2756 5462,2756 5462,-80 -73,-80
12V on Top Layer "12V_L01_P021" (solid, remove dead copper, pour order 21): 1202,3864 1202,3737 1172,3737 1037,3737 1037,2493 720,2493 720,3864
GND on Top Layer "GND_L01_P008" (solid, remove dead copper, pour order 8): 1401,665 1401,1111 1803,1111 1824,1090 1824,998 1780,954 1488,954 1489,953 1489,665
12V on PWR + Signal "NONET_L-01_P-001" (solid, remove dead copper, pour order 2): 2006,3180 2006,3031 2057,2979 2057,2568 1721,2568 1721,2750 868,2750 868,1993 546,1671 546,552 -72,552 -72,-76 1721,-76 1721,274 1662,333 1662,902 1721,961 1721,2365 2481,2365 2481,2967 2528,3014 2528,3180
5V on PWR + Signal "NONET_L-01_P-001" (solid, remove dead copper, pour order 4): 4312,2556 4312,866 1627,866 1627,691 2101,691 2101,125 5117,125 5117,2556
3V3 on PWR + Signal "3V3_L02_P028" (solid, remove dead copper, pour order 28): -73,4060 5462,4060 5462,3533 5181,3533 5181,2756 5462,2756 5462,-80 -73,-80
BMB1 on PWR + Signal "BMB1_L02_P017" (solid, remove dead copper, pour order 17): 1901,2879 1901,2599 1732.5,2599 1732.5,2866 1520,2866 1520,2968 35,2968 35,3156 1901,3156
BMB2 on PWR + Signal "BMB2_L02_P018" (solid, remove dead copper, pour order 18): 1512,2858 1714,2858 1714,2760 34,2760 34,2948 1512,2948
BMA2 on GND + Signal "BMA2_L03_P020" (solid, remove dead copper, pour order 20): 1196,2362 1196,2847 914,2847 914,2550 36,2550 36,2362
GND on GND + Signal "GND_L03_P030" (solid, remove dead copper, pour order 30): -73,4060 5462,4060 5462,3533 5181,3533 5181,2756 5462,2756 5462,-80 -73,-80
BMA1 on GND + Signal "BMA1_L03_P019" (solid, remove dead copper, pour order 19): 897,2562 897,2857 1211,2857 1211,2539 1348,2539 1348,2954 625,2954 625,2750 36,2750 36,2562
VDC on GND + Signal "NONET_L-01_P-001" (solid, remove dead copper, pour order 13): 1156,401 1156,261 1156,257 1166,257 1418,257 1418,146 1491,73 5079,73 5079,360 5462,360 5462,-80 981,-80 981,401
DC_VIN on GND + Signal "NONET_L-01_P-001" (solid, remove dead copper, pour order 11): 1168,1116 1168,269 1419,269 1419,860 5292,860 5292,1116

## Other copper
Top Layer:
  rectangle net ESP-EN: 3133.71,3824.71 3249.71,3893.71
  rectangle net GND: 5141,3415 5191,3523
  rectangle net 3V3: 2453,2734.2 2540,2784
  rectangle net 3V3: 2404,2940 2432,2972
  rectangle net 12V: 2234,2458 2267,2567
  rectangle net GND: 2211,2792 2502,2824
  region net 12V: 2267,2446 2267,2494 1503,2494 1503,2446
  rectangle net GND: 2021,3261 2522,3439
  region net 12V: 2250,2978 2250,3179 2106,3179 2106,2978
  rectangle net 12V: 2014,3017 2528,3179
  rectangle net NetR18_2: 1749,2774 1786,2988
  rectangle net NetR18_2: 1749,2774 1859,2798
  rectangle net 12V: 891,2492 1073,2543
  rectangle net 12V: 970,2502 1073,2684
  region net BMA2: 1069,2864 902,2864 902,2769 1069,2769
  rectangle net NetR17_2: 1137,2772 1174,2988
  rectangle net 12V: 1582,2502 1685,2684
  rectangle net 12V: 1495,2443 1685,2543
  region net BMB1: 1681,2948 1517,2948 1517,2872 1681,2872
  region net BMB2: 1681,2864 1517,2864 1517,2769 1681,2769
  region net BMA1: 1069,2952 903,2952 903,2872 1069,2872
  rectangle net GND: 1714,332 1913,604
  rectangle net 3V3: 4365,3771 4448,3821
  rectangle net GND: 701,422 844,504
  rectangle net 3V3: 564,1937 622,2051
  region net 3V3: 1888,1070 1844,1070 1844,879.82 1888,879.82
  region net 3V3: 1888,880.03 1888,949.03 1499.82,949.03 1499.82,880.03
  rectangle net IO0: 3529,3824 3645,3893
  rectangle net GND: 4312,2546 4531,2636
  rectangle net DC_VIN: 1194,274 1405,522
  rectangle net 12V: 917,410 1171,521
  rectangle net 5V: 1589,767 1711,866
  rectangle net GND: 1796,30 1825,59
  rectangle net GND: 1812,30 1924,579
  rectangle net GND: 1713,574 2077,689
  rectangle net 5V: 1692,715 2310,866
  rectangle net NetC1_1: 2128,434 2291,640
  rectangle net NetC1_1: 1935,229 2009,264
  rectangle net NetC1_1: 1999,229 2291,495
  rectangle net 12V: 1502,128 1803,215
  region net 12V: 1502,223.88 1502,156.88 1669.3,156.88 1669.3,223.88
  region net GND: 1502,367.25 1502,262.88 1667.3,262.88 1667.3,367.25
  rectangle net 5V: 2104,127 2185,209
  rectangle net NetC4_1: 1935,75 2181,112
  rectangle net 3V3: 1498,767 1576,949
  rectangle net 5V: 1607,715 1714,852
  region net GND: 534,91 534,178 462,178 462,91
  region net NetQ1_1: 436.5,41 436.5,179 393.5,179 393.5,41
  region net NetD5_1: 516,219 516,527 409,527 409,219
  rectangle net 12V: 245,222 358,321
  rectangle net 3V3: 1498,665 1536,851
  region net GND: 5037,4007 5037,3862 5151,3862 5151,4007
  region net 3V3: 5037,3783 5037,3594 5130,3594 5130,3783
  region net 3V3: 5088,3783 5088,3419 5131,3419 5131,3783
  rectangle net 12V: 1135,3813 1189,3855
  region net NetD6_1: 1292,3936.69 1292,3981 1149,3981 1149,3936.69
  region net GND: 1329,3900 1289,3900 1289,3813 1329,3813
  rectangle net NetQ2_1: 1220,3763 1260,3901
  pour cut-out: 1632,2960 1809,2960 1809,2497 1632,2497
  pour cut-out: 2082,868.75 2348,868.75 2348,527 2082,527
  pour cut-out: 1019,2960 1196,2960 1196,2497 1019,2497
  pour cut-out: -92,1782 399.45,1782 546,1647.67 546,552 -92,552
PWR + Signal:
  pour cut-out: -92,1782 399.45,1782 546,1647.67 546,552 -92,552
GND + Signal:
  pour cut-out: -92,1782 399.45,1782 546,1647.67 546,552 -92,552
Bottom Layer:
  region net BMB2: 1682,2853 1547,2853 1547,2769 1682,2769
  region net BMB1: 1682,2953 1547,2953 1547,2869 1682,2869
  region net BMA1: 1069,2953 934,2953 934,2869 1069,2869
  region net BMA2: 1069,2853 934,2853 934,2769 1069,2769
  rectangle net 3V3: 5037,3628 5136,3783
  pour cut-out: 1541,2958 1687,2958 1687,2762 1681,2762 1682,2762 1541,2762
  pour cut-out: 929,2958 1075,2958 1075,2762 1069,2762 1070,2762 929,2762
  pour cut-out: -92,1782 399.36,1782 546,1647.58 546,342 -92,342

## Silkscreen, mask and mechanical layers (free items; w line width, h text height)
Top Overlay:
  lines w7: 4429,2581 4429,2594
  lines w10: 823,2682 801,2682 790,2693 790,2816 802,2828 832,2828 ; 1366,2462 1396,2462 1408,2474 1408,2597 1397,2608 1368,2608 ; 1368,2896 1397,2896 1408,2907 1408,3020 1396,3032 1370,3032 ; 1441,2682 1415,2682 1404,2693 1404,2816 1416,2828 1446,2828 ; 1978,3042 2008,3042 2020,3030 2020,2907 2009,2896 1980,2896 ; 1980,2609 2009,2609 2020,2598 2020,2475 2008,2463 1988,2463 ; 2025,83 2025,123 ; 2145,2917 2145,3023 2434,3023 2434,2918 ; 2384,923 2384,829 2396.5,816.5 ; 2414,929 2414,850 2455,809 ; 2678,2905 2678,3026 3017,3026 3017,2913 ; 4664,3573 4664,3587 4686,3609 4752,3609
  text "RESET or TOGGLE" at 4422.5,4031 h50
  text "GREEN LED" at 2280,4017.79 h45
  text "RED LED" at 2602,4017.79 h45
  text "PROG. HEADER" at 3917,4013 h50
  text "RESET" at 2949.63,4002 h55
  text "BOOT" at 3350.4,4002 h55
  text "HOMING LIMIT SWITCH" at -85.29,3726 h50 r270
  text "BUZZER" at 763.93,3642 h60
  text "USB_P" at 4419.4,3590.52 h35
  text "USB_N" at 4540.4,3590.52 h35
  text "NEMA17 STEPPER MOTOR" at -84,3154 h65 r270
  text "B+" at 386.56,3113.25 h70 r270
  text "@" at 2452,2985 h40
  text "@" at 3034,2983 h40
  text "B-" at 386.56,2920.03 h70 r270
  text "A+" at 386.56,2718.03 h70 r270
  text "20 x 4 LCD HEADER" at 4164,2652.5 h70 r270
  text "A-" at 386.56,2515.03 h70 r270
  text "SPI" at 5168,2480 h70 r270
  text "0-24mA INPUT" at -84,2288 h65 r270
  text "NC" at -86.87,1744.12 h60 r270
  text "COM" at -86.87,1547.78 h60 r270
  text "NO" at -86.87,1338.37 h60 r270
  text "O2-HEATING LED" at 1027.57,1147.23 h55 r270
  text "LAMBDA BOARD PWR" at 5387.73,1128.5 h50 r270
  text "KILL RELAY" at -77.12,1091.13 h65
  text "RUN LED" at 3946,1058 h55 r270
  text "ENCODER" at 3147.26,1041.53 h75 r270
  text "MODE SWITCH" at 4639.38,1035 h60 r270
  text "GND" at 1767.41,1019.51 h50 r270
  text "12V" at 1994.63,1019.48 h50 r270
  text "5V" at 1915.63,1018.48 h50 r270
  text "3V3" at 1842.63,1017.48 h50 r270
  text "POWER LED" at 1027.57,801.27 h55 r270
  text "TEST LED" at 3945.75,778.81 h55 r270
  text "12V DC" at 5393,580.75 h75 r270
  text "12V DC ON/OFF" at 1325.75,372 h65 r270
  text "COMMS SERIAL" at 2681,54.23 h65
Bottom Overlay:
  drawing of 16 lines, arcs and shapes, not listed
  text "ZERO CARBON FOOTPRINT" at 3087.55,1206.88 h40
Board Outline:
  lines w5: 332,1830.99 8.95,1830.99 ccw(c8.95,1820.99) -1.05,1820.99 ccw(c8.95,1820.99) 8.95,1810.99 333,1810.99 ccw(c333,1820.99) 343,1820.99 ccw(c333,1820.99) 333,1830.99 ; 65.17,1210.83 95.83,1180.17 251.76,1180.17 ccw(c251.76,1190.17) 261.76,1190.17 ccw(c251.76,1190.17) 251.76,1200.17 105.83,1200.17 85.17,1220.83 85.17,1352.17 101.17,1368.17 251.76,1368.17 ccw(c251.76,1378.17) 261.76,1378.17 ccw(c251.76,1378.17) 251.76,1388.17 103,1388.17 85.17,1406 85.17,1552.17 101.17,1568.17 251.76,1568.17 ccw(c251.76,1578.17) 261.76,1578.17 ccw(c251.76,1578.17) 251.76,1588.17 92.17,1588.17 65.17,1561.17 65.17,1361.17 65.17,1210.83 ; 102.01,350 ccw(c112.01,350) 112.01,340 ccw(c112.01,350) 122.01,350 122.01,520.05 ccw(c112.01,520.05) 112.01,530.05 ccw(c112.01,520.05) 102.01,520.05 102.01,350 ; 338.23,356.59 ccw(c348.23,356.59) 348.23,346.59 ccw(c348.23,356.59) 358.23,356.59 358.23,526.64 ccw(c348.23,526.64) 348.23,536.64 ccw(c348.23,526.64) 338.23,526.64 338.23,356.59 ; 365.23,901.77 396,871 530,871 568,909 568,1190 436.5,1321.5 429.92,1314.92 ccw(c444.24,1300.59) 423.98,1300.59 545.77,1178.81 545.77,917.77 520,892 405.23,892 385.23,912 385.23,1006.95 ccw(c375.23,1006.95) 375.23,1016.95 ccw(c375.23,1006.95) 365.23,1006.95 365.23,901.77 ; 545.77,256.59 ccw(c555.77,256.59) 555.77,246.59 ccw(c555.77,256.59) 565.77,256.59 565.77,526.64 ccw(c555.77,526.64) 555.77,536.64 ccw(c555.77,526.64) 545.77,526.64 545.77,256.59
  lines w15: 5479,4081 -92,4081 -92,-92 5479,-92 5479,2771 5201.7,2771 5201.7,3515 5479,3515 5479,4081 ; 5479,4081 5479,4081
Fabrication:
  drawing of 295 lines, arcs and shapes, not listed
  text "Layer" at 6040.58,1382 h60
  text "Name" at 6450.49,1382 h60
  text "Material" at 7380.23,1382 h60
  text "Thickness" at 8240,1382 h60
  text "Constant" at 8889.84,1382 h60
  text "Board Layer Stack" at 9459.7,1382 h60
  text "Top Overlay" at 6450.49,1262 h60
  text "Top Solder" at 6450.49,1142 h60
  text "Solder Resist" at 7380.23,1142 h60
  text "0.71mil" at 8240,1142 h60
  text "3.5" at 8889.84,1142 h60
  text "1" at 6040.58,1022 h60
  text "Top Layer" at 6450.49,1022 h60
  text "CF-004" at 7380.23,1022 h60
  text "1.38mil" at 8240,1022 h60
  text "Dielectric 2" at 6450.49,902 h60
  text "PP-006" at 7380.23,902 h60
  text "7.99mil" at 8240,902 h60
  text "4.4" at 8889.84,902 h60
  text "2" at 6040.58,782 h60
  text "PWR + Signal" at 6450.49,782 h60
  text "1.18mil" at 8240,782 h60
  text "Dielectric 1" at 6450.49,662 h60
  text "FR-4" at 7380.23,662 h60
  text "40.55mil" at 8240,662 h60
  text "4.6" at 8889.84,662 h60
  text "3" at 6040.58,542 h60
  text "GND + Signal" at 6450.49,542 h60
  text "1.18mil" at 8240,542 h60
  text "Dielectric 3" at 6450.49,422 h60
  text "PP-006" at 7380.23,422 h60
  text "7.99mil" at 8240,422 h60
  text "4.4" at 8889.84,422 h60
  text "4" at 6040.58,302 h60
  text "Bottom Layer" at 6450.49,302 h60
  text "CF-004" at 7380.23,302 h60
  text "1.38mil" at 8240,302 h60
  text "Bottom Solder" at 6450.49,182 h60
  text "Solder Resist" at 7380.23,182 h60
  text "0.71mil" at 8240,182 h60
  text "3.5" at 8889.84,182 h60
  text "Bottom Overlay" at 6450.49,62 h60
  text "Total board thickness:" at 6040.58,-58 h60
  text "63.07mil" at 8240,-58 h60
Drill Drawing:
  drawing of 172 lines, arcs and shapes, not listed
  text "Symbol" at 6028.5,4222.94 h72
  text "Count" at 6534.38,4222.94 h72
  text "Hole Size" at 7134.22,4222.94 h72
  text "Plated" at 8283.88,4222.94 h72
  text "Hole Type" at 8789.76,4222.94 h72
  text "Drill Layer Pair" at 9523.56,4222.94 h72
  text "Via/Pad" at 11023.11,4222.94 h72
  text "Pad Shape" at 11612.96,4222.94 h72
  text "Template" at 12358.76,4222.94 h72
  text "Hole Length" at 13938.28,4222.94 h72
  text "Routed Path Length" at 15037.96,4222.94 h72
  text "359" at 6534.38,4072.94 h60
  text "11.81mil (0.300mm)" at 7134.22,4072.94 h60
  text "PTH" at 8283.88,4072.94 h60
  text "Round" at 8789.76,4072.94 h60
  text "Top Layer - Bottom Layer" at 9523.56,4072.94 h60
  text "Via" at 11023.11,4072.94 h60
  text "Rounded" at 11612.96,4072.94 h60
  text "v60h30" at 12358.76,4072.94 h60
  text "-" at 13938.28,4072.94 h60
  text "-" at 15037.96,4072.94 h60
  text "6" at 6534.38,3922.94 h60
  text "32.28mil (0.820mm)" at 7134.22,3922.94 h60
  text "PTH" at 8283.88,3922.94 h60
  text "Round" at 8789.76,3922.94 h60
  text "Top Layer - Bottom Layer" at 9523.56,3922.94 h60
  text "Pad" at 11023.11,3922.94 h60
  text "Rounded" at 11612.96,3922.94 h60
  text "c152h82" at 12358.76,3922.94 h60
  text "-" at 13938.28,3922.94 h60
  text "-" at 15037.96,3922.94 h60
  text "8" at 6534.38,3772.94 h60
  text "35.43mil (0.900mm)" at 7134.22,3772.94 h60
  text "PTH" at 8283.88,3772.94 h60
  text "Round" at 8789.76,3772.94 h60
  text "Top Layer - Bottom Layer" at 9523.56,3772.94 h60
  text "Pad" at 11023.11,3772.94 h60
  text "(Mixed)" at 11612.96,3772.94 h60
  text "(Mixed)" at 12358.76,3772.94 h60
  text "-" at 13938.28,3772.94 h60
  text "-" at 15037.96,3772.94 h60
  text "4" at 6534.38,3622.94 h60
  text "35.43mil (0.900mm)" at 7134.22,3622.94 h60
  text "PTH" at 8283.88,3622.94 h60
  text "Round" at 8789.76,3622.94 h60
  text "Top Layer - Bottom Layer" at 9523.56,3622.94 h60
  text "Pad" at 11023.11,3622.94 h60
  text "Rounded" at 11612.96,3622.94 h60
  text "c152h90o0_0m157mx157p152" at 12358.76,3622.94 h60
  text "-" at 13938.28,3622.94 h60
  text "-" at 15037.96,3622.94 h60
  text "4" at 6534.38,3472.94 h60
  text "37.40mil (0.950mm)" at 7134.22,3472.94 h60
  text "PTH" at 8283.88,3472.94 h60
  text "Round" at 8789.76,3472.94 h60
  text "Top Layer - Bottom Layer" at 9523.56,3472.94 h60
  text "Pad" at 11023.11,3472.94 h60
  text "(Mixed)" at 11612.96,3472.94 h60
  text "(Mixed)" at 12358.76,3472.94 h60
  text "-" at 13938.28,3472.94 h60
  text "-" at 15037.96,3472.94 h60
  text "5" at 6534.38,3322.94 h60
  text "39.37mil (1.000mm)" at 7134.22,3322.94 h60
  text "PTH" at 8283.88,3322.94 h60
  text "Round" at 8789.76,3322.94 h60
  text "Top Layer - Bottom Layer" at 9523.56,3322.94 h60
  text "Pad" at 11023.11,3322.94 h60
  text "(Mixed)" at 11612.96,3322.94 h60
  text "(Mixed)" at 12358.76,3322.94 h60
  text "-" at 13938.28,3322.94 h60
  text "-" at 15037.96,3322.94 h60
  text "9" at 6534.38,3172.94 h60
  text "43.31mil (1.100mm)" at 7134.22,3172.94 h60
  text "PTH" at 8283.88,3172.94 h60
  text "Round" at 8789.76,3172.94 h60
  text "Top Layer - Bottom Layer" at 9523.56,3172.94 h60
  text "Pad" at 11023.11,3172.94 h60
  text "(Mixed)" at 11612.96,3172.94 h60
  text "(Mixed)" at 12358.76,3172.94 h60
  text "-" at 13938.28,3172.94 h60
  text "-" at 15037.96,3172.94 h60
  text "4" at 6534.38,3022.94 h60
  text "47.24mil (1.200mm)" at 7134.22,3022.94 h60
  text "PTH" at 8283.88,3022.94 h60
  text "Round" at 8789.76,3022.94 h60
  text "Top Layer - Bottom Layer" at 9523.56,3022.94 h60
  text "Pad" at 11023.11,3022.94 h60
  text "Rounded" at 11612.96,3022.94 h60
  text "c180h120m185mx185p180" at 12358.76,3022.94 h60
  text "-" at 13938.28,3022.94 h60
  text "-" at 15037.96,3022.94 h60
  text "5" at 6534.38,2872.94 h60
  text "51.18mil (1.300mm)" at 7134.22,2872.94 h60
  text "PTH" at 8283.88,2872.94 h60
  text "Round" at 8789.76,2872.94 h60
  text "Top Layer - Bottom Layer" at 9523.56,2872.94 h60
  text "Pad" at 11023.11,2872.94 h60
  text "(Mixed)" at 11612.96,2872.94 h60
  text "(Mixed)" at 12358.76,2872.94 h60
  text "-" at 13938.28,2872.94 h60
  text "-" at 15037.96,2872.94 h60
  text "2" at 6534.38,2722.94 h60
  text "55.12mil (1.400mm)" at 7134.22,2722.94 h60
  text "PTH" at 8283.88,2722.94 h60
  text "Round" at 8789.76,2722.94 h60
  text "Top Layer - Bottom Layer" at 9523.56,2722.94 h60
  text "Pad" at 11023.11,2722.94 h60
  text "Rounded" at 11612.96,2722.94 h60
  text "c220h140o0_0m225mx225p220" at 12358.76,2722.94 h60
  text "-" at 13938.28,2722.94 h60
  text "-" at 15037.96,2722.94 h60
  text "2" at 6534.38,2572.94 h60
  text "59.06mil (1.500mm)" at 7134.22,2572.94 h60
  text "PTH" at 8283.88,2572.94 h60
  text "Rectangle" at 8789.76,2572.94 h60
  text "Top Layer - Bottom Layer" at 9523.56,2572.94 h60
  text "Pad" at 11023.11,2572.94 h60
  text "Rectangle" at 11612.96,2572.94 h60
  text "r250_350h150_230" at 12358.76,2572.94 h60
  text "90.55mil (2.300mm)" at 13938.28,2572.94 h60
  text "90.55mil (2.300mm)" at 15037.96,2572.94 h60
  text "18" at 6534.38,2422.94 h60
  text "62.99mil (1.600mm)" at 7134.22,2422.94 h60
  text "PTH" at 8283.88,2422.94 h60
  text "Round" at 8789.76,2422.94 h60
  text "Top Layer - Bottom Layer" at 9523.56,2422.94 h60
  text "Pad" at 11023.11,2422.94 h60
  text "(Mixed)" at 11612.96,2422.94 h60
  text "(Mixed)" at 12358.76,2422.94 h60
  text "-" at 13938.28,2422.94 h60
  text "-" at 15037.96,2422.94 h60
  text "10" at 6534.38,2272.94 h60
  text "118.11mil (3.000mm)" at 7134.22,2272.94 h60
  text "PTH" at 8283.88,2272.94 h60
  text "Round" at 8789.76,2272.94 h60
  text "Top Layer - Bottom Layer" at 9523.56,2272.94 h60
  text "Pad" at 11023.11,2272.94 h60
  text "Rounded" at 11612.96,2272.94 h60
  text "(Mixed)" at 12358.76,2272.94 h60
  text "-" at 13938.28,2272.94 h60
  text "-" at 15037.96,2272.94 h60
  text "3" at 6534.38,2122.94 h60
  text "157.48mil (4.000mm)" at 7134.22,2122.94 h60
  text "PTH" at 8283.88,2122.94 h60
  text "Round" at 8789.76,2122.94 h60
  text "Top Layer - Bottom Layer" at 9523.56,2122.94 h60
  text "Pad" at 11023.11,2122.94 h60
  text "Rounded" at 11612.96,2122.94 h60
  text "c400h400" at 12358.76,2122.94 h60
  text "-" at 13938.28,2122.94 h60
  text "-" at 15037.96,2122.94 h60
  text "439 Total" at 6534.38,1972.94 h60
  text "Symbol" at 6028.5,1922.99 h72
  text "Count" at 6534.38,1922.99 h72
  text "Hole Size" at 6968.27,1922.99 h72
  text "Plated" at 7690.08,1922.99 h72
  text "Hole Type" at 8195.96,1922.99 h72
  text "Drill Layer Pair" at 8929.76,1922.99 h72
  text "Via/Pad" at 10119.41,1922.99 h72
  text "Pad Shape" at 10709.26,1922.99 h72
  text "Template" at 11455.06,1922.99 h72
  text "Hole Length" at 12104.89,1922.99 h72
  text "Routed Path Length" at 12970.65,1922.99 h72
  text "Slot definitions :" at 6028.5,1827.97 h60
  text "Routed Path Length" at 7061.19,1827.97 h60
  text "= Calculated from tool start centre position to tool end centre position." at 8163.86,1827.97 h60
  text "Hole Length" at 7061.19,1727.99 h60
  text "= Routed Path Length + Tool Size = Slot length as defined in the PCB layout" at 7753.99,1727.99 h60

## Dimensions
-92,4081 to -92,-92 on Dimensions
-92,4081 to 5479,4081 on Dimensions

## Text inside footprints (layer, text, board x,y; h text height)
K1: Top Overlay "1" at 479.78,413.47 h40 r90
SW3: Top Overlay "1" at 2633.13,467.87 h39.37 r90
SW4: Top Overlay "Board Edge" at 898,-24 h30